# Altium PCB PCB1.pcbdoc
Units mil, origin at the board's own origin, x right, y up, seen from the top; angles counter-clockwise.
Board outline 2398 x 2138 mil, 2 copper layers (Top Layer, Bottom Layer), stack 62.206 mil thick; 49 components, 59 nets, 252 pads, 148 vias.
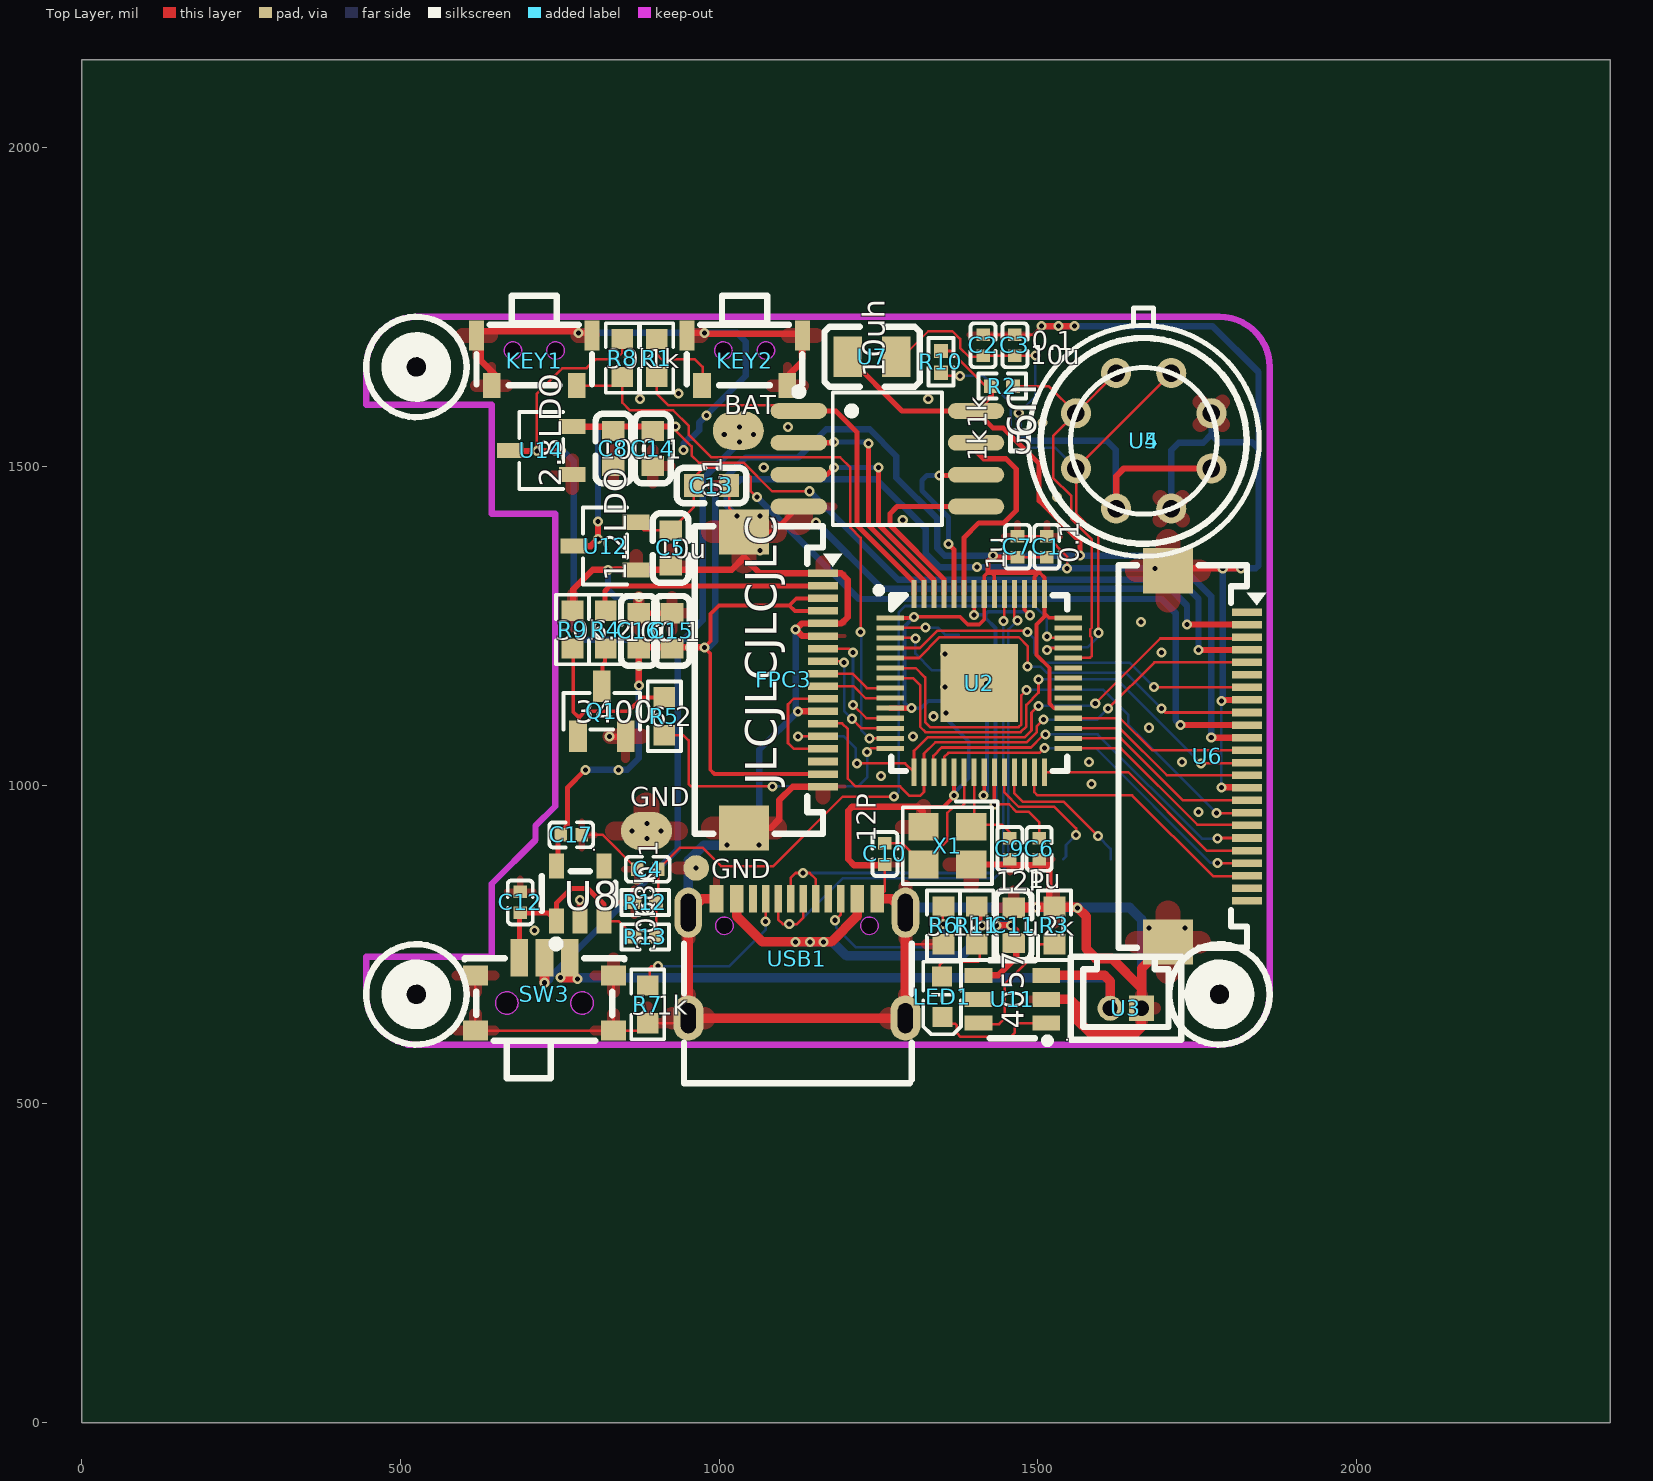
[diagram p0: Top Layer view]
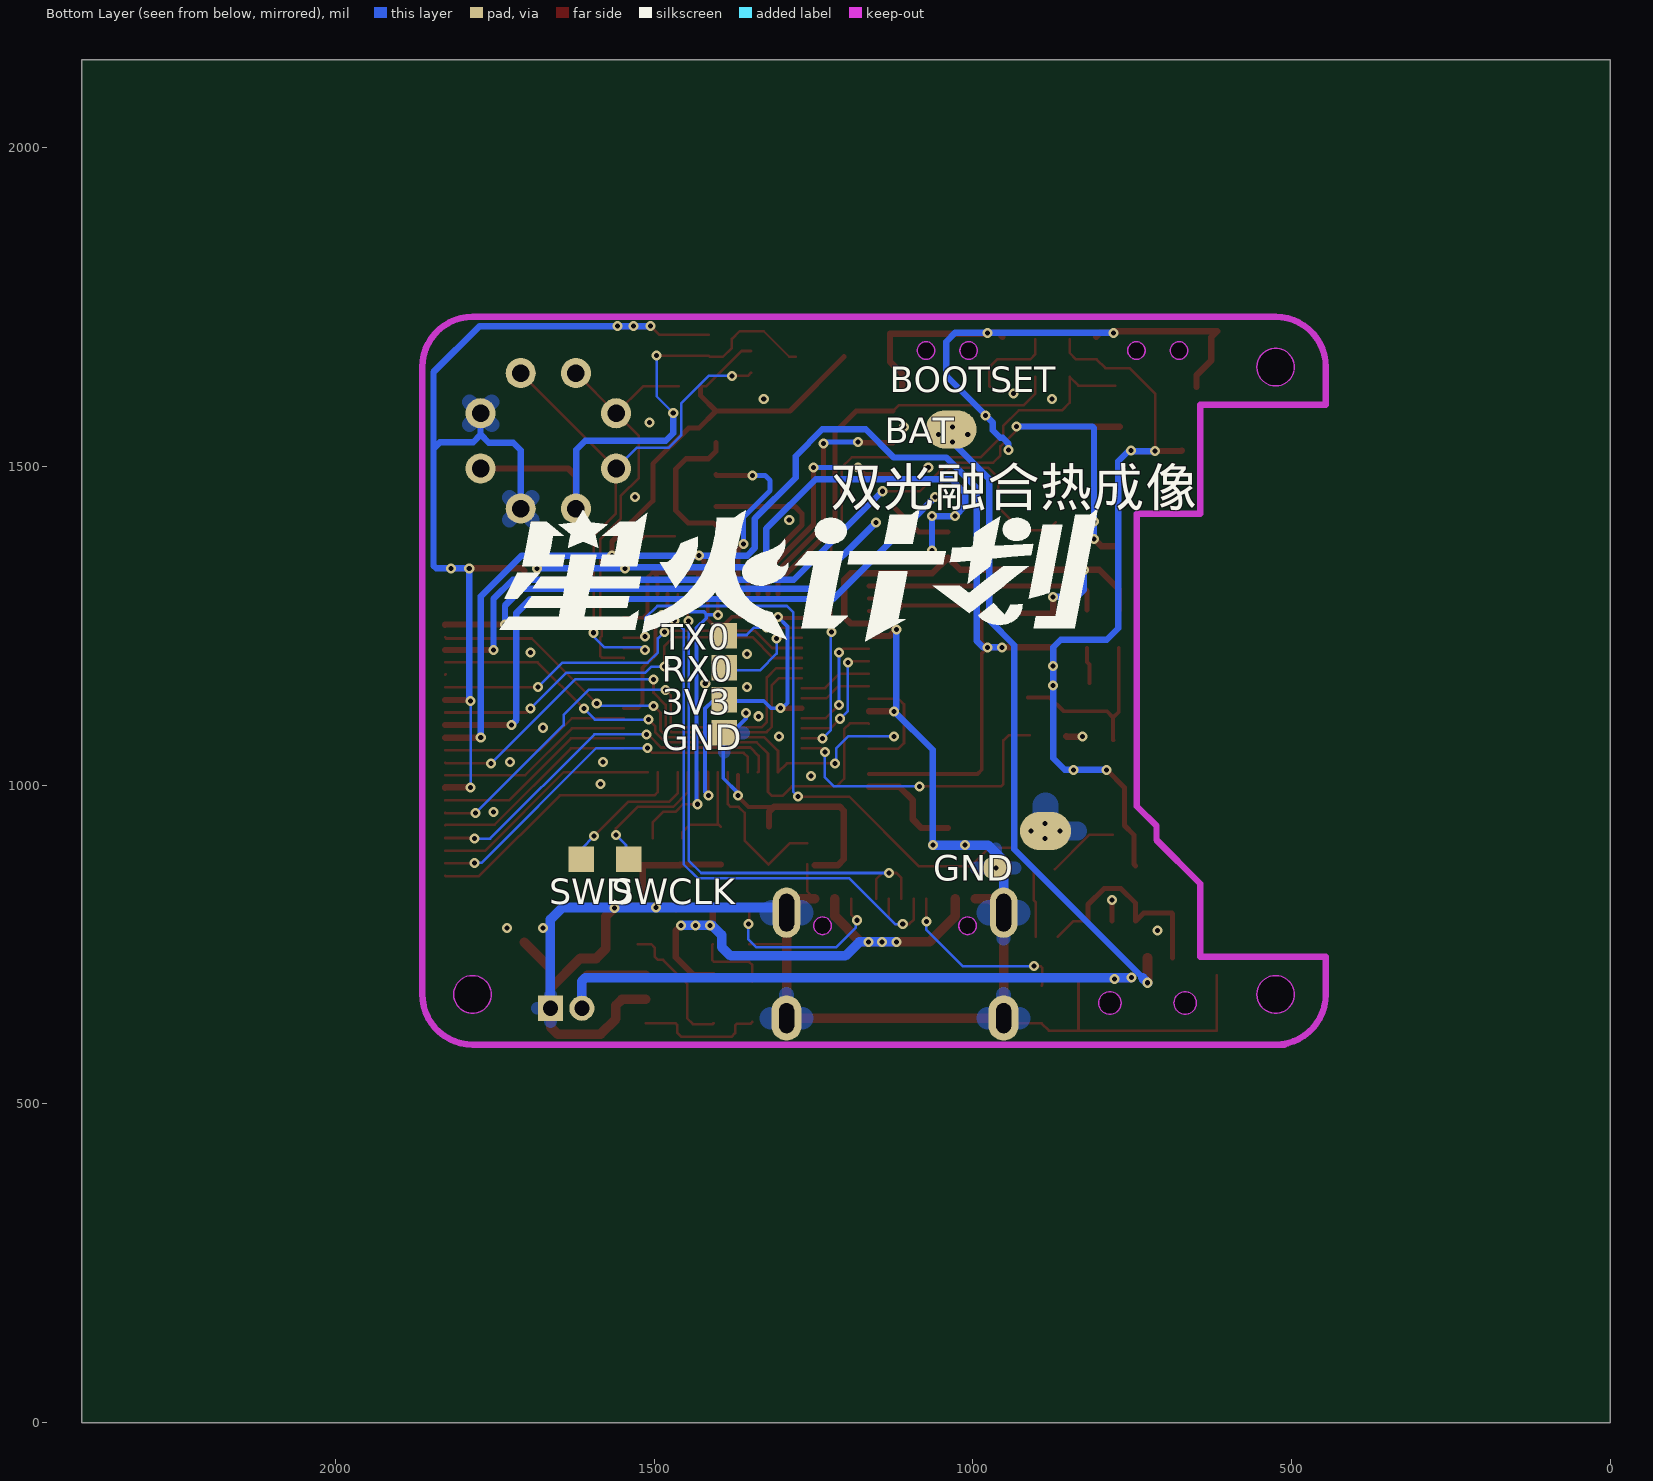
[diagram p1: Bottom Layer view, seen from below]

## Layer stack, top to bottom
Top Solder Mask Layer: solder mask 0.394, Dk 3.3
Top Layer: signal copper 1.379
Dielectric1: surface 59.449, FR4, Dk 4.5
Bottom Layer: signal copper 1.378
Bottom Solder Mask Layer: solder mask 0.394, Dk 3.3

## Board outline
2398,0 0,0 0,2138 2398,2138
cut-out: 1814.42,671.7 cw(c1784.89,671.7) 1755.36,671.7 cw(c1784.89,671.7)
cut-out: 554.58,671.7 cw(c525.05,671.7) 495.52,671.7 cw(c525.05,671.7)
cut-out: 554.58,1655.7 cw(c525.05,1655.7) 495.52,1655.7 cw(c525.05,1655.7)

## Design rules (kind name [scope] priority, off if disabled: settings)
BoardOutlineClearance Plane_Default_1 [All] p2 off: genericclearance=4 ignorepadtopadclearanceinfootprint=FALSE except(0: Arc-SplitContinuation Track-SplitContinuation SMDPad-SplitContinuation THPad-SplitContinuation Via-SplitContinuation Fill-SplitContinuation Region-SplitContinuation Poly-SplitContinuation Text-SplitContinuation Hole-SplitContinuation; 3: Arc-OutlineEdge Track-OutlineEdge SMDPad-OutlineEdge THPad-OutlineEdge Via-OutlineEdge Fill-OutlineEdge Region-OutlineEdge Poly-OutlineEdge Text-OutlineEdge Hole-OutlineEdge Arc-CutoutEdge Track-CutoutEdge SMDPad-CutoutEdge THPad-CutoutEdge Via-CutoutEdge Fill-CutoutEdge Region-CutoutEdge Poly-CutoutEdge Text-CutoutEdge Hole-CutoutEdge)
BoardOutlineClearance Copper_Default_1 [All] p4 off: genericclearance=4 ignorepadtopadclearanceinfootprint=FALSE except(0: Arc-SplitContinuation Track-SplitContinuation SMDPad-SplitContinuation THPad-SplitContinuation Via-SplitContinuation Fill-SplitContinuation Region-SplitContinuation Poly-SplitContinuation Text-SplitContinuation Hole-SplitContinuation; 3: Arc-OutlineEdge Track-OutlineEdge SMDPad-OutlineEdge THPad-OutlineEdge Via-OutlineEdge Fill-OutlineEdge Region-OutlineEdge Poly-OutlineEdge Text-OutlineEdge Hole-OutlineEdge Arc-CutoutEdge Track-CutoutEdge SMDPad-CutoutEdge THPad-CutoutEdge Via-CutoutEdge Fill-CutoutEdge Region-CutoutEdge Poly-CutoutEdge Text-CutoutEdge Hole-CutoutEdge)
BoardOutlineClearance Copper_gge126909_1 [All] p6 off: genericclearance=4 ignorepadtopadclearanceinfootprint=FALSE except(0: Arc-SplitContinuation Track-SplitContinuation SMDPad-SplitContinuation THPad-SplitContinuation Via-SplitContinuation Fill-SplitContinuation Region-SplitContinuation Poly-SplitContinuation Text-SplitContinuation Hole-SplitContinuation; 3: Arc-OutlineEdge Track-OutlineEdge SMDPad-OutlineEdge THPad-OutlineEdge Via-OutlineEdge Fill-OutlineEdge Region-OutlineEdge Text-OutlineEdge Hole-OutlineEdge Arc-CutoutEdge Track-CutoutEdge SMDPad-CutoutEdge THPad-CutoutEdge Via-CutoutEdge Fill-CutoutEdge Region-CutoutEdge Text-CutoutEdge Hole-CutoutEdge; 10: Poly-OutlineEdge Poly-CutoutEdge)
BoardOutlineClearance Copper_gge127110_1 [All] p8 off: genericclearance=4 ignorepadtopadclearanceinfootprint=FALSE except(0: Arc-SplitContinuation Track-SplitContinuation SMDPad-SplitContinuation THPad-SplitContinuation Via-SplitContinuation Fill-SplitContinuation Region-SplitContinuation Poly-SplitContinuation Text-SplitContinuation Hole-SplitContinuation; 3: Arc-OutlineEdge Track-OutlineEdge SMDPad-OutlineEdge THPad-OutlineEdge Via-OutlineEdge Fill-OutlineEdge Region-OutlineEdge Text-OutlineEdge Hole-OutlineEdge Arc-CutoutEdge Track-CutoutEdge SMDPad-CutoutEdge THPad-CutoutEdge Via-CutoutEdge Fill-CutoutEdge Region-CutoutEdge Text-CutoutEdge Hole-CutoutEdge; 10: Poly-OutlineEdge Poly-CutoutEdge)
BoardOutlineClearance Default_1 [All] p10: genericclearance=4 ignorepadtopadclearanceinfootprint=FALSE except(0: Arc-SplitContinuation Track-SplitContinuation SMDPad-SplitContinuation THPad-SplitContinuation Via-SplitContinuation Fill-SplitContinuation Region-SplitContinuation Poly-SplitContinuation Text-SplitContinuation Hole-SplitContinuation; 3: Arc-OutlineEdge Track-OutlineEdge SMDPad-OutlineEdge THPad-OutlineEdge Via-OutlineEdge Fill-OutlineEdge Region-OutlineEdge Poly-OutlineEdge Text-OutlineEdge Hole-OutlineEdge Arc-CutoutEdge Track-CutoutEdge SMDPad-CutoutEdge THPad-CutoutEdge Via-CutoutEdge Fill-CutoutEdge Region-CutoutEdge Poly-CutoutEdge Text-CutoutEdge Hole-CutoutEdge)
Clearance Plane_Default [All] p1 off: gap=4 ignorepadtopadclearanceinfootprint=FALSE except(3: SMDPad-Track SMDPad-SMDPad THPad-Track SMDPad-THPad THPad-THPad Track-Via SMDPad-Via THPad-Via Via-Via Fill-Track Region-Track Fill-SMDPad Region-SMDPad Fill-THPad Region-THPad Fill-Via Region-Via Fill-Fill Fill-Region Region-Region Poly-Track Poly-SMDPad Poly-THPad Poly-Via Poly-Fill Poly-Region Poly-Poly Arc-Track Arc-SMDPad Arc-THPad Arc-Via Fill-Arc Region-Arc Poly-Arc Arc-Arc Text-Track SMDPad-Text Text-THPad Text-Via Fill-Text Region-Text Poly-Text Arc-Text Text-Text Hole-Track Hole-SMDPad Hole-THPad Hole-Via Fill-Hole Region-Hole Poly-Hole Hole-Arc Hole-Text)
Clearance Copper_Default [All] p3 off: gap=4 ignorepadtopadclearanceinfootprint=FALSE except(3: SMDPad-Track SMDPad-SMDPad THPad-Track SMDPad-THPad THPad-THPad Track-Via SMDPad-Via THPad-Via Via-Via Fill-Track Region-Track Fill-SMDPad Region-SMDPad Fill-THPad Region-THPad Fill-Via Region-Via Fill-Fill Fill-Region Region-Region Poly-Track Poly-SMDPad Poly-THPad Poly-Via Poly-Fill Poly-Region Poly-Poly Arc-Track Arc-SMDPad Arc-THPad Arc-Via Fill-Arc Region-Arc Poly-Arc Arc-Arc Text-Track SMDPad-Text Text-THPad Text-Via Fill-Text Region-Text Poly-Text Arc-Text Text-Text Hole-Track Hole-SMDPad Hole-THPad Hole-Via Fill-Hole Region-Hole Poly-Hole Hole-Arc Hole-Text)
Clearance Copper_gge126909 [All] p5 off: gap=4 ignorepadtopadclearanceinfootprint=FALSE except(3: SMDPad-Track SMDPad-SMDPad THPad-Track SMDPad-THPad THPad-THPad Track-Via SMDPad-Via THPad-Via Via-Via Fill-Track Region-Track Fill-SMDPad Region-SMDPad Fill-THPad Region-THPad Fill-Via Region-Via Fill-Fill Fill-Region Region-Region Arc-Track Arc-SMDPad Arc-THPad Arc-Via Fill-Arc Region-Arc Arc-Arc Text-Track SMDPad-Text Text-THPad Text-Via Fill-Text Region-Text Arc-Text Text-Text Hole-Track Hole-SMDPad Hole-THPad Hole-Via Fill-Hole Region-Hole Hole-Arc Hole-Text; 10: Poly-Track Poly-SMDPad Poly-THPad Poly-Via Poly-Fill Poly-Region Poly-Poly Poly-Arc Poly-Text Poly-Hole)
Clearance Copper_gge127110 [All] p7 off: gap=4 ignorepadtopadclearanceinfootprint=FALSE except(3: SMDPad-Track SMDPad-SMDPad THPad-Track SMDPad-THPad THPad-THPad Track-Via SMDPad-Via THPad-Via Via-Via Fill-Track Region-Track Fill-SMDPad Region-SMDPad Fill-THPad Region-THPad Fill-Via Region-Via Fill-Fill Fill-Region Region-Region Arc-Track Arc-SMDPad Arc-THPad Arc-Via Fill-Arc Region-Arc Arc-Arc Text-Track SMDPad-Text Text-THPad Text-Via Fill-Text Region-Text Arc-Text Text-Text Hole-Track Hole-SMDPad Hole-THPad Hole-Via Fill-Hole Region-Hole Hole-Arc Hole-Text; 10: Poly-Track Poly-SMDPad Poly-THPad Poly-Via Poly-Fill Poly-Region Poly-Poly Poly-Arc Poly-Text Poly-Hole)
Clearance Default [All] p9: gap=4 ignorepadtopadclearanceinfootprint=FALSE except(3: SMDPad-Track SMDPad-SMDPad THPad-Track SMDPad-THPad THPad-THPad Track-Via SMDPad-Via THPad-Via Via-Via Fill-Track Region-Track Fill-SMDPad Region-SMDPad Fill-THPad Region-THPad Fill-Via Region-Via Fill-Fill Fill-Region Region-Region Poly-Track Poly-SMDPad Poly-THPad Poly-Via Poly-Fill Poly-Region Poly-Poly Arc-Track Arc-SMDPad Arc-THPad Arc-Via Fill-Arc Region-Arc Poly-Arc Arc-Arc Text-Track SMDPad-Text Text-THPad Text-Via Fill-Text Region-Text Poly-Text Arc-Text Text-Text Hole-Track Hole-SMDPad Hole-THPad Hole-Via Fill-Hole Region-Hole Poly-Hole Hole-Arc Hole-Text)
DiffPairsRouting differentialPair [All] p1: maxlimit=6 minlimit=6 mostfreqgap=6 toplayer_minwidth=5 toplayer_prefwidth=10 toplayer_maxwidth=100 toplayer_mingap=6 toplayer_prefgap=6 toplayer_maxgap=6 bottomlayer_minwidth=5 bottomlayer_prefwidth=10 bottomlayer_maxwidth=100 bottomlayer_mingap=6 bottomlayer_prefgap=6 bottomlayer_maxgap=6 maxuncoupledlength=10
HoleToHoleClearance otherClearance [All] p1: gap=11.8 allowstackedmicrovias=TRUE
Length netLength [All] p1: minlimit=0 maxlimit=0
PasteMaskExpansion Common [All] p1: expansion=0
PlaneConnect Default_4 [All] p1: planeconnectstyle=Relief reliefexpansion=20 reliefentries=4 reliefconductorwidth=0 reliefairgap=10
PolygonConnect gge126909 [All] p1 off: connectstyle=Relief reliefconductorwidth=0 reliefentries=4 polygonreliefangle="90 Angle" airgapwidth=1 smdpad.connectstyle=Relief smdpad.reliefconductorwidth=0 smdpad.reliefentries=4 smdpad.polygonreliefangle="90 Angle" smdpad.airgapwidth=10 via.connectstyle=Relief via.reliefconductorwidth=10 via.reliefentries=4 via.polygonreliefangle="90 Angle" via.airgapwidth=10
PolygonConnect gge127110 [All] p2 off: connectstyle=Relief reliefconductorwidth=0 reliefentries=4 polygonreliefangle="90 Angle" airgapwidth=1 smdpad.connectstyle=Relief smdpad.reliefconductorwidth=0 smdpad.reliefentries=4 smdpad.polygonreliefangle="90 Angle" smdpad.airgapwidth=10 via.connectstyle=Relief via.reliefconductorwidth=10 via.reliefentries=4 via.polygonreliefangle="90 Angle" via.airgapwidth=10
PolygonConnect Default_5 [All] p3: connectstyle=Relief reliefconductorwidth=0 reliefentries=4 polygonreliefangle="90 Angle" airgapwidth=1 smdpad.connectstyle=Relief smdpad.reliefconductorwidth=0 smdpad.reliefentries=4 smdpad.polygonreliefangle="90 Angle" smdpad.airgapwidth=10 via.connectstyle=Relief via.reliefconductorwidth=10 via.reliefentries=4 via.polygonreliefangle="90 Angle" via.airgapwidth=10
RoutingVias Default_3 [All] p1: holewidth=7.87 width=15.75 viastyle="Through Hole" minholewidth=7.87 minwidth=15.75 maxholewidth=2362 maxwidth=3938
SolderMaskExpansion Common_1 [IsVia] p1: expansion=-1000 istentingtop=TRUE
SolderMaskExpansion Common_1 [All] p2: expansion=2 istentingtop=FALSE
Width Default_2 [All] p1: maxlimit=1000 minlimit=4 preferedwidth=4

## Components (designator, comment, footprint, x,y, rotation, side; value= is the part's Value field where it differs from the comment)
C1 "100nF" C0402 1514,1374 r90 top
C2 "10uF" C0402 1414,1690 r270 top
C3 "100nF" C0402 1464,1690 r270 top
C4 "100nF" C0402 888,868 r0 top
C5 "10uF" C0603 924,1372 r270 top
C6 "1uF" C0402 1502,900 r270 top
C7 "1uF" C0402 1468,1374 r90 top
C8 "10uF" C0603 834,1528 r270 top
C9 "12pF" C0402 1456,900 r90 top
C10 "12pF" C0402 1260,892 r270 top
C11 "1uF" C0603 1462,780 r90 top
C12 "1uF" C0402 688,816 r90 top
C13 "100nF" C0603 988,1470 r0 top
C14 "100nF" C0603 896,1528 r270 top
C15 "100nF" C0603 926,1242 r270 top
C16 "10uF" C0603 874,1242 r90 top
C17 "1uF" C0402 768,922 r0 top
FPC3 "FPC 0.5-18P HYH2.0" FPC-SMD_18P-P0.50_FPC-0.5-18P-HYH2.0 1101,1165 r270 top
KEY1 "1TS003B-2500-3500A-CT" KEY-SMD_1TS003B-2500-3500A-CT 710,1666 r180 top
KEY2 "1TS003B-2500-3500A-CT" KEY-SMD_1TS003B-2500-3500A-CT 1040,1666 r180 top
LED1 "NCD0603G1" LED0603-RD_1 1350,668 r90 top
Q1 "AO3400A" SOT-23-3_L2.9-W1.3-P1.90-LS2.4-BR 816,1116 r270 top
R1 "1kΩ" R0603 902,1670 r90 top
R2 "1kΩ" R0402 1444,1626 r180 top
R3 "2kΩ" R0603 1526,780 r270 top
R4 "6.2Ω" R0603 822,1244 r270 top
R5 "6.2Ω" R0603 914,1108 r270 top
R6 "5.1kΩ" R0603 1352,780 r90 top
R7 "5.1kΩ" R0603 888,656 r270 top
R8 "30kΩ" R0603 848,1670 r270 top
R9 "30kΩ" R0603 770,1244 r90 top
R10 "1kΩ" R0402 1348,1664 r90 top
R11 "1kΩ" R0603 1404,780 r270 top
R12 "68kΩ" R0402 884,816 r0 top
R13 "30kΩ" R0402 884,762 r0 top
SW3 "MINI MSK12CO2" SW-SMD_MSK12CO2 726,672 r0 top
U2 "RP2040" LQFN-56_L7.0-W7.0-P0.4-EP 1408,1160 r0 top
U3 "ZX-MX1.25-2PZZ" CONN-TH_2P-P1.25_MEGASTAR_ZX-MX1.25-2PZZ 1638,650 r180 top
U4 "HEIMANN" TO-39-4_MELEXIS_MLX90640 1666,1540 r90 top
U5 "MLX90640ESF-BAB-000-TU" TO-39-4_MELEXIS_MLX90640 1666,1540 r0 top
U6 "FPC 0.5-24P HYH2.0" FPC-SMD_24P-P0.50_FPC-0.5-24P-HYH2.0 1766,1045 r270 top
U7 "10uH" IND-SMD_L2.0-W1.6-1 1240,1672 r180 top
U8 "RT9013-33GB-MS" SOT-23-5_L2.9-W1.6-P0.95-LS2.8-BR 782,830 r270 top
U9 "W25Q32JVSSIQ" SOIC-8_L5.3-W5.3-P1.27-LS8.0-BL 1264,1512 r270 top
U11 "TP4057" SOT-23-6_L2.9-W1.6-P0.95-LS2.8-BR 1460,664 r0 top
U12 "XC6206P122MR(1uA)" SOT-23-3_L2.9-W1.6-P1.90-LS2.8-BR 821,1375 r0 top
U14 "XC6206P282MR(1uA)" SOT-23-3_L2.9-W1.6-P1.90-LS2.8-BR 721,1525 r0 top
USB1 "TYPE-C 16PIN 2MD(073)" USB-C-SMD_TYPE-C-6PIN-2MD-073 1122,728 r0 top
X1 "12MHz" OSC-SMD_4P-L2.5-W2.0-BL 1358,905 r180 top

## Footprints (in the part's own frame and the unit in brackets; to place one, negate y for a bottom-side part, rotate by r counter-clockwise, add the part's x,y. Pads: shape width x height; smd on the part's side, far side on the other; paste and mask are expansions set on the pad)
C0402 [mm]
  rect 0.5x0.54 smd: 1(-0.42,0) 2(0.42,0)
  silkscreen extent -0.87,-0.5 0.87,0.5
C0603 [mm]
  rect 0.8x0.9 smd: 1(-0.7,0) 2(0.7,0)
  silkscreen extent -1.39,-0.71 1.39,0.71
CONN-TH_2P-P1.25_MEGASTAR_ZX-MX1.25-2PZZ [mm]
  rect 1x1 hole 0.6: 1(-0.625,0)
  round 1 hole 0.6: 2(0.625,0)
  silkscreen extent -2.2,-2.05 2.2,1.25
FPC-SMD_18P-P0.50_FPC-0.5-18P-HYH2.0 [mm]
  rect 0.3x1.2 smd paste+0 mask+0.05: 1(-4.25,1.575) 2(-3.75,1.575) 3(-3.25,1.575) 4(-2.75,1.575) 5(-2.25,1.575) 6(-1.75,1.575) 7(-1.25,1.575) 8(-0.75,1.575) 9(-0.25,1.575) 10(0.25,1.575) 11(0.75,1.575) 12(1.25,1.575) 13(1.75,1.575) 14(2.25,1.575) 15(2.75,1.575) 16(3.25,1.575) 17(3.75,1.575) 18(4.25,1.575)
  rect 1.8x2 smd paste+0 mask+0.05: 19(5.9,-1.575) 20(-5.9,-1.575)
  silkscreen extent -6.13,-3.54 6.12,2.34
FPC-SMD_24P-P0.50_FPC-0.5-24P-HYH2.0 [mm]
  rect 0.3x1.2 smd paste+0 mask+0.05: 1(-5.75,1.575) 2(-5.25,1.575) 3(-4.75,1.575) 4(-4.25,1.575) 5(-3.75,1.575) 6(-3.25,1.575) 7(-2.75,1.575) 8(-2.25,1.575) 9(-1.75,1.575) 10(-1.25,1.575) 11(-0.75,1.575) 12(-0.25,1.575) 13(0.25,1.575) 14(0.75,1.575) 15(1.25,1.575) 16(1.75,1.575) 17(2.25,1.575) 18(2.75,1.575) 19(3.25,1.575) 20(3.75,1.575) 21(4.25,1.575) 22(4.75,1.575) 23(5.25,1.575) 24(5.75,1.575)
  rect 1.8x2 smd paste+0 mask+0.05: 25(7.4,-1.575) 26(-7.4,-1.575)
  silkscreen extent -7.63,-3.54 7.62,2.34
IND-SMD_L2.0-W1.6-1 [mm]
  rect 1.133x1.6 smd: 1(-0.966,0) 2(0.966,0)
  silkscreen extent -1.9,-1.2 1.9,1.2
KEY-SMD_1TS003B-2500-3500A-CT [mm]
  rect 0.6x1.2 smd: 0(-2.3,-1) 0(2.3,-1)
  rect 0.7x1 smd: 1(-1.7,1) 2(1.7,1)
  Board Outline Layer circle w0.003: c-0.85,-0.4 r0.35
  Board Outline Layer circle w0.003: c0.85,-0.4 r0.35
  Board Outline Layer region: -1.2,-0.4 -1.165,-0.248 -1.068,-0.126 -0.928,-0.059 -0.772,-0.059 -0.632,-0.126 -0.535,-0.248 -0.5,-0.4 -0.5,-0.4 -0.535,-0.552 -0.632,-0.674 -0.772,-0.741 -0.928,-0.741 -1.068,-0.674 -1.165,-0.552 -1.2,-0.4
  Board Outline Layer region: -1.2,-0.4 -1.191,-0.322 -1.165,-0.248 -1.124,-0.182 -1.068,-0.126 -1.002,-0.085 -0.928,-0.059 -0.85,-0.05 -0.772,-0.059 -0.698,-0.085 -0.632,-0.126 -0.576,-0.182 -0.535,-0.248 -0.509,-0.322 -0.5,-0.4 -0.509,-0.478 -0.535,-0.552 -0.576,-0.618 -0.632,-0.674 -0.698,-0.715 -0.772,-0.741 -0.85,-0.75 -0.928,-0.741 -1.002,-0.715 -1.068,-0.674 -1.124,-0.618 -1.165,-0.552 -1.191,-0.478
  Board Outline Layer region: 0.5,-0.4 0.535,-0.248 0.632,-0.126 0.772,-0.059 0.928,-0.059 1.068,-0.126 1.165,-0.248 1.2,-0.4 1.2,-0.4 1.165,-0.552 1.068,-0.674 0.928,-0.741 0.772,-0.741 0.632,-0.674 0.535,-0.552 0.5,-0.4
  Board Outline Layer region: 0.5,-0.4 0.509,-0.322 0.535,-0.248 0.576,-0.182 0.632,-0.126 0.698,-0.085 0.772,-0.059 0.85,-0.05 0.928,-0.059 1.002,-0.085 1.068,-0.126 1.124,-0.182 1.165,-0.248 1.191,-0.322 1.2,-0.4 1.191,-0.478 1.165,-0.552 1.124,-0.618 1.068,-0.674 1.002,-0.715 0.928,-0.741 0.85,-0.75 0.772,-0.741 0.698,-0.715 0.632,-0.674 0.576,-0.618 0.535,-0.552 0.509,-0.478
  Multi-Layer board cut-out: -1.2,-0.4 -1.165,-0.248 -1.068,-0.126 -0.928,-0.059 -0.772,-0.059 -0.632,-0.126 -0.535,-0.248 -0.5,-0.4 -0.5,-0.4 -0.535,-0.552 -0.632,-0.674 -0.772,-0.741 -0.928,-0.741 -1.068,-0.674 -1.165,-0.552 -1.2,-0.4
  Multi-Layer board cut-out: 0.5,-0.4 0.535,-0.248 0.632,-0.126 0.772,-0.059 0.928,-0.059 1.068,-0.126 1.165,-0.248 1.2,-0.4 1.2,-0.4 1.165,-0.552 1.068,-0.674 0.928,-0.741 0.772,-0.741 0.632,-0.674 0.535,-0.552 0.5,-0.4
  silkscreen extent -2.3,-2.59 2.3,0.99
LED0603-RD_1 [mm]
  rect 0.8x0.8 smd: 1(-0.799,-0.004) 2(0.799,0.004)
  silkscreen extent -1.49,-0.75 1.39,0.76
LQFN-56_L7.0-W7.0-P0.4-EP [mm]
  rect 1.1x0.2 smd paste-100 mask+0.05: 1(-3.55,2.6) 2(-3.55,2.2) 3(-3.55,1.8) 4(-3.55,1.4) 5(-3.55,1) 6(-3.55,0.6) 7(-3.55,0.2) 8(-3.55,-0.2) 9(-3.55,-0.6) 10(-3.55,-1) 11(-3.55,-1.4) 12(-3.55,-1.8) 13(-3.55,-2.2) 14(-3.55,-2.6) 29(3.55,-2.6) 30(3.55,-2.2) 31(3.55,-1.8) 32(3.55,-1.4) 33(3.55,-1) 34(3.55,-0.6) 35(3.55,-0.2) 36(3.55,0.2) 37(3.55,0.6) 38(3.55,1) 39(3.55,1.4) 40(3.55,1.8) 41(3.55,2.2) 42(3.55,2.6)
  rect 0.2x1.1 smd paste-100 mask+0.05: 15(-2.6,-3.55) 16(-2.2,-3.55) 17(-1.8,-3.55) 18(-1.4,-3.55) 19(-1,-3.55) 20(-0.6,-3.55) 21(-0.2,-3.55) 22(0.2,-3.55) 23(0.6,-3.55) 24(1,-3.55) 25(1.4,-3.55) 26(1.8,-3.55) 27(2.2,-3.55) 28(2.6,-3.55) 43(2.6,3.55) 44(2.2,3.55) 45(1.8,3.55) 46(1.4,3.55) 47(1,3.55) 48(0.6,3.55) 49(0.2,3.55) 50(-0.2,3.55) 51(-0.6,3.55) 52(-1,3.55) 53(-1.4,3.55) 54(-1.8,3.55) 55(-2.2,3.55) 56(-2.6,3.55)
  rect 3.1x3.1 smd paste-100 mask+0.05: 57(0,0)
  silkscreen extent -4.13,-3.5 3.5,3.83
OSC-SMD_4P-L2.5-W2.0-BL [mm]
  rect 1.2x1.1 smd: 1(-0.95,-0.75) 2(0.95,-0.75) 3(0.95,0.75) 4(-0.95,0.75)
  silkscreen extent -2.01,-1.76 1.78,1.53
R0402 [mm]
  rect 0.566x0.54 smd paste-100 mask+0.051: 1(-0.433,0) 2(0.433,0)
  silkscreen extent -0.94,-0.5 0.94,0.5
R0603 [mil]
  rect 31.75x34.02 smd paste-3937.01 mask+2: 1(-29.66,0) 2(29.66,0)
  silkscreen extent -55,-26 55,26
SOIC-8_L5.3-W5.3-P1.27-LS8.0-BL [mm]
  oval 0.63x2.25 smd: 1(-1.905,-3.53) 2(-0.635,-3.53) 3(0.635,-3.53) 4(1.905,-3.53) 5(1.905,3.53) 6(0.635,3.53) 7(-0.635,3.53) 8(-1.905,3.53)
  silkscreen extent -2.82,-3.68 2.64,2.18
SOT-23-3_L2.9-W1.3-P1.90-LS2.4-BR [mm]
  rect 1.25x0.7 smd: 1(1,-0.95) 2(1,0.95) 3(-1,0)
  silkscreen extent -0.73,-1.53 0.73,1.53
SOT-23-3_L2.9-W1.6-P1.90-LS2.8-BR [mm]
  rect 1.07x0.6 smd: 1(1.235,-0.95) 2(1.235,0.95) 3(-1.235,0)
  silkscreen extent -0.88,-1.54 0.88,1.54
SOT-23-5_L2.9-W1.6-P0.95-LS2.8-BR [mm]
  rect 1x0.6 smd paste+0 mask+0.05: 1(1.1,-0.95) 2(1.1,0) 3(1.1,0.95) 4(-1.1,0.95) 5(-1.1,-0.95)
  silkscreen extent -0.89,-1.52 2.16,1.4
SOT-23-6_L2.9-W1.6-P0.95-LS2.8-BR [mm]
  rect 1.1x0.6 smd paste+0 mask+0.051: 1(1.35,-0.95) 2(1.35,0) 3(1.35,0.95) 4(-1.35,0.95) 5(-1.35,0) 6(-1.35,-0.95)
  silkscreen extent -0.9,-1.78 1.52,1.55
SW-SMD_MSK12CO2 [mm]
  rect 0.7x1.5 smd: 1(-1,1.45) 2(0,1.45) 3(1,1.45)
  rect 1x0.8 smd: 4(-2.75,-1.45) 4(-2.75,0.75) 5(2.75,-1.45) 5(2.75,0.75)
  Board Outline Layer circle w0.003: c-1.5,-0.35 r0.45
  Board Outline Layer circle w0.003: c1.5,-0.35 r0.45
  Board Outline Layer region: -1.05,-0.35 -1.094,-0.545 -1.219,-0.702 -1.4,-0.789 -1.6,-0.789 -1.78,-0.702 -1.905,-0.545 -1.95,-0.35 -1.95,-0.35 -1.905,-0.155 -1.78,0.002 -1.6,0.089 -1.4,0.089 -1.219,0.002 -1.094,-0.155 -1.05,-0.35
  Board Outline Layer region: -1.05,-0.35 -1.06,-0.444 -1.089,-0.533 -1.136,-0.615 -1.199,-0.684 -1.275,-0.74 -1.361,-0.778 -1.453,-0.798 -1.547,-0.798 -1.639,-0.778 -1.725,-0.74 -1.801,-0.684 -1.864,-0.615 -1.911,-0.533 -1.94,-0.444 -1.95,-0.35 -1.94,-0.256 -1.911,-0.167 -1.864,-0.086 -1.801,-0.016 -1.725,0.04 -1.639,0.078 -1.547,0.098 -1.453,0.098 -1.361,0.078 -1.275,0.04 -1.199,-0.016 -1.136,-0.086 -1.089,-0.167 -1.06,-0.256
  Board Outline Layer region: 1.95,-0.35 1.906,-0.545 1.781,-0.702 1.6,-0.789 1.4,-0.789 1.22,-0.702 1.095,-0.545 1.05,-0.35 1.05,-0.35 1.095,-0.155 1.22,0.002 1.4,0.089 1.6,0.089 1.781,0.002 1.906,-0.155 1.95,-0.35
  Board Outline Layer region: 1.95,-0.35 1.94,-0.444 1.911,-0.533 1.864,-0.615 1.801,-0.684 1.725,-0.74 1.639,-0.778 1.547,-0.798 1.453,-0.798 1.361,-0.778 1.275,-0.74 1.199,-0.684 1.136,-0.615 1.089,-0.533 1.06,-0.444 1.05,-0.35 1.06,-0.256 1.089,-0.167 1.136,-0.086 1.199,-0.016 1.275,0.04 1.361,0.078 1.453,0.098 1.547,0.098 1.639,0.078 1.725,0.04 1.801,-0.016 1.864,-0.086 1.911,-0.167 1.94,-0.256
  Multi-Layer board cut-out: -1.05,-0.35 -1.094,-0.545 -1.219,-0.702 -1.4,-0.789 -1.6,-0.789 -1.78,-0.702 -1.905,-0.545 -1.95,-0.35 -1.95,-0.35 -1.905,-0.155 -1.78,0.002 -1.6,0.089 -1.4,0.089 -1.219,0.002 -1.094,-0.155 -1.05,-0.35
  Multi-Layer board cut-out: 1.95,-0.35 1.906,-0.545 1.781,-0.702 1.6,-0.789 1.4,-0.789 1.22,-0.702 1.095,-0.545 1.05,-0.35 1.05,-0.35 1.095,-0.155 1.22,0.002 1.4,0.089 1.6,0.089 1.781,0.002 1.906,-0.155 1.95,-0.35
  silkscreen extent -3.17,-3.35 3.17,1.43
TO-39-4_MELEXIS_MLX90640 [mm]
  round 1.2 hole 0.7 copper offset -0.001,0 paste+0 mask+0.05: 1(-1.099,2.7) 2(-1.099,-2.7) 3(1.101,-2.7) 4(1.101,2.7)
  silkscreen extent -4.6,-4.6 4.6,5.3
USB-C-SMD_TYPE-C-6PIN-2MD-073 [mm]
  rect 0.55x1.1 smd paste-100 mask+0.05: 1(-3.2,2.375) 2(-2.4,2.375) 11(2.4,2.375) 12(3.2,2.375)
  rect 0.3x1.1 smd paste-100 mask+0.05: 3(-1.75,2.375) 4(-1.25,2.375) 5(-0.75,2.375) 6(-0.25,2.375) 7(0.25,2.375) 8(0.75,2.375) 9(1.25,2.375) 10(1.75,2.375)
  oval 1.2x1.8 hole 0.6 slot 1.2 at 90 deg paste+0 mask+0.05: 13(-4.325,-2.375) 14(4.325,-2.375)
  oval 1.1x2 hole 0.6 slot 1.5 at 90 deg paste+0 mask+0.05: 13(-4.325,1.825) 14(4.325,1.825)
  Board Outline Layer circle w0.003: c-2.89,1.305 r0.35
  Board Outline Layer circle w0.003: c2.89,1.305 r0.35
  Board Outline Layer region: -2.54,1.305 -2.575,1.153 -2.672,1.031 -2.812,0.964 -2.968,0.964 -3.108,1.031 -3.205,1.153 -3.24,1.305 -3.24,1.305 -3.205,1.457 -3.108,1.579 -2.968,1.646 -2.812,1.646 -2.672,1.579 -2.575,1.457 -2.54,1.305
  Board Outline Layer region: -2.54,1.305 -2.549,1.227 -2.575,1.153 -2.616,1.087 -2.672,1.031 -2.738,0.99 -2.812,0.964 -2.89,0.955 -2.968,0.964 -3.042,0.99 -3.108,1.031 -3.164,1.087 -3.205,1.153 -3.231,1.227 -3.24,1.305 -3.231,1.383 -3.205,1.457 -3.164,1.523 -3.108,1.579 -3.042,1.62 -2.968,1.646 -2.89,1.655 -2.812,1.646 -2.738,1.62 -2.672,1.579 -2.616,1.523 -2.575,1.457 -2.549,1.383
  Board Outline Layer region: 3.24,1.305 3.205,1.153 3.108,1.031 2.968,0.964 2.812,0.964 2.672,1.031 2.575,1.153 2.54,1.305 2.54,1.305 2.575,1.457 2.672,1.579 2.812,1.646 2.968,1.646 3.108,1.579 3.205,1.457 3.24,1.305
  Board Outline Layer region: 3.24,1.305 3.231,1.227 3.205,1.153 3.164,1.087 3.108,1.031 3.042,0.99 2.968,0.964 2.89,0.955 2.812,0.964 2.738,0.99 2.672,1.031 2.616,1.087 2.575,1.153 2.549,1.227 2.54,1.305 2.549,1.383 2.575,1.457 2.616,1.523 2.672,1.579 2.738,1.62 2.812,1.646 2.89,1.655 2.968,1.646 3.042,1.62 3.108,1.579 3.164,1.523 3.205,1.457 3.231,1.383
  Multi-Layer board cut-out: -2.54,1.305 -2.575,1.153 -2.672,1.031 -2.812,0.964 -2.968,0.964 -3.108,1.031 -3.205,1.153 -3.24,1.305 -3.24,1.305 -3.205,1.457 -3.108,1.579 -2.968,1.646 -2.812,1.646 -2.672,1.579 -2.575,1.457 -2.54,1.305
  Multi-Layer board cut-out: 3.24,1.305 3.205,1.153 3.108,1.031 2.968,0.964 2.812,0.964 2.672,1.031 2.575,1.153 2.54,1.305 2.54,1.305 2.575,1.457 2.672,1.579 2.812,1.646 2.968,1.646 3.108,1.579 3.205,1.457 3.24,1.305
  silkscreen extent -4.5,-4.97 4.57,0.6

## Free pads (board coordinates)
  oval 80x60 smd: 1(886,928) 1(1030,1556)
  oval 80x60 smd far side: 1(886,928) 1(1034,1558)
  round 40 smd: 1(964,870)
  round 40 smd far side: 1(964,870)
  rect 40x40 smd far side: 1(1390,1184) 2(1390,1082) 2(1390,1134) 2(1390,1234) 2(1540,884) 2(1614,884)

## Via types
v1: diameter 15.75, hole 7.9, Top Layer to Bottom Layer, 148 vias

## Nets (pads, with @x,y where several pads share a name; then routed paths per layer and width w, separated by ;. In a path a pad name is that pad's centre, name@x,y a point inside that pad or via, vN(x,y) a via of type N, cw(c..) or ccw(c..) an arc to the next point about the centre after c; other vN are vias at no path point)
1.1V: C6.1 U2.23 U2.45 U2.50 | length 624.2
  Top Layer w4: v1(1432,970) 1454.69,970 1466.69,958 1486,958 1502,942 C6.1
  Top Layer w6: v1(1400,1267.13) 1400.12,1267.25 U2.50 ; U2.23 1431.62,970.38 v1(1432,970) ; U2.45 1478.86,1275.14 v1(1487.51,1266.49)
  Bottom Layer w6: v1(1400,1267.13) 1416.87,1267.13 1418.13,1265.87 ; v1(1432,970) 1433.66,971.66 1433.66,1246.34 1418.13,1261.87 1418.13,1265.87 ; v1(1487.51,1266.49) 1482,1272 1422,1272 1418.13,1268.13 1418.13,1265.87
3V3: C1.1 C7.1 C15.2 C16.1 C17.1 FPC3.3 FPC3.4 FPC3.17 pad.2@1390,1134 R2.2 R8.1 R10.2 U2.1 U2.10 U2.22 U2.33 U2.42 U2.43 U2.44 U2.48 U2.49 U6.11 U7.2 U8.5 U9.8 U14.3 | length 5579.1
  Top Layer w4: v1@714,1525 714,1614 754,1654 792,1654 806,1668 838,1668 848,1678 R8.1 ; R10.2 1362.96,1681.04 1418,1626 R2.2 ; C7.1 C1.1
  Top Layer w6: FPC3.17 992.64,1017.36 986,1024 986,1206.73 v1(976.73,1216) 986.44,1225.71 986.44,1268.44 1000,1282 1110,1282 ; FPC3.4 1118.74,1273.26 1110,1282 ; FPC3.3 1120.95,1292.95 1110,1282 ; U2.1 1304.36,1262.36 v1(1306,1264) 1378,1264 1390,1252 1408,1252 1415.87,1259.87 U2.49 1415.87,1327.87 1422,1334 ; v1(1414.99,984) 1415.87,984.88 U2.22 ; 1426,1334 1431.62,1328.38 U2.48 ; U2.44 1494.61,1326.61 1500.24,1332.24 1503.76,1332.24 ; 1502,1334 1503.76,1332.24 ; U2.33 1525.37,1120.63 1518,1128 1518,1184 1498,1204 1498,1252 1510.36,1264.36 1510.36,1269.64 ; U2.42 1547.6,1262.53 1517.47,1262.53 1510.36,1269.64 ; 1503.76,1332.24 1510.36,1325.64 U2.43 1510.36,1269.64
  Top Layer w8: U8.5 747.46,876.18 747.46,922 762,936.54 762,996 790,1024 v1(790.45,1024) ; U7.2 1286.95,1587 U9.8 ; U2.10 v1(1302.1,1120.63) ; R2.2 1426.96,1610.98 U9.8 ; C7.1 1427.46,1357.46 1422,1352 1422,1334 1426,1334 1502,1334 ; v1(1566,1360) 1566,1382 1502,1446 1502,1504 1446,1560 1429.98,1560 U9.8
  Top Layer w10: U14.3 673.24,1524.13 713.13,1524.13 v1@714,1525 ; v1(714,1524) 751,1524 v1(752,1525) ; v1(874,1156) v1(874,1186.71) 874,1216.44 930,1216.44 930.44,1216 v1(954,1216) v1(976.73,1216) ; v1(1772,1074.46) U6.11@1827.94,1074.46
  Bottom Layer w6: v1(1306,1264) 1291,1249 1291,1129 1299.37,1120.63 v1(1302.1,1120.63) 1316.63,1120.63 1328,1132 1408,1132 1420,1120 1420,989.01 v1(1414.99,984)
  Bottom Layer w10: v1(714,1524) 756,1524 772,1508 772,1246 790,1228 862,1228 874,1216 v1(874,1186.71) v1(874,1156) 874,1042 856,1024 v1(842,1024) v1(790.45,1024) ; v1(954,1216) v1(976.73,1216) 984,1216 994,1226 994,1466 1042,1514 1124,1514 1168,1558 1236,1558 1278.02,1515.98 1278.02,1482.13 1342,1418.14 1342,1372 1354.13,1359.87 v1(1429.93,1359.87) 1708.13,1359.87 1772,1296 v1(1772,1074.46)
$1N4171: KEY2.2 R1.2 | length 135.7
  Top Layer w4: R1.2 902,1676 910,1668 962,1668 974,1656 974,1625.56 KEY2.2@973.07,1624.63
$1N4175: C2.2 C3.2 U4.2 U5.2 U7.1 | length 853.6
  Top Layer w4: U7.1 1288,1672 1328,1712 1366,1712 1378,1700 1378,1686 1392,1672 1412.54,1672 C2.2 C3.2 v1@1496,1673.46
  Top Layer w10: U5.2 1622.69,1484.69 1634.69,1496.69 U4.2
  Bottom Layer w4: v1(1470,1584) 1496,1610 v1(1496,1674)
  Bottom Layer w10: v1(1470,1584) 1470,1552 1482,1540 1608,1540 1622,1526 1622,1434.39 U5.2
$1N4297: R6.2 USB1.10 | length 287.5
  Top Layer w4: v1(1181.98,788) 1190.91,796.92 USB1.10 ; R6.2@1351,809.65 1351,783 v1(1352,782)
  Bottom Layer w4: v1(1181.98,788) 1184,785.98 1184,776 1214,746 1340,746 1352,758 v1(1352,782)
$1N4298: R7.1 USB1.4 | length 282.9
  Top Layer w4: R7.1@892,685.66 891.17,686.49 891.17,713.17 894,716 v1(904,716) ; v1(1072.8,786) USB1.4
  Bottom Layer w4: v1(904,716) 1016,716 1072.8,772.8 v1(1072.8,786)
$1N5455: R3.2 U11.6 | length 211.4
  Top Layer w4: U11.6 1408.28,625.17 1439.17,625.17 1448,634 1448,688 1486,726 1494,726 1499.17,731.17 1499.17,745.17 1504.34,750.34 R3.2
$1N5625: LED1.2 R11.2 | length 117.5
  Top Layer w4: LED1.2@1346,691.5 1346,718 1350.83,722.83 1406,722.83 1408.83,725.66 1408.83,749.52 R11.2@1408,750.35
$1N5640: LED1.1 U11.1 | length 199.7
  Top Layer w4: LED1.1@1346,628.5 1348.5,626 1370,626 1372.83,623.17 1372.83,611.17 1378.83,605.17 1457.17,605.17 1464,612 1464,624 1466.6,626.6 U11.1
$1N8207: FPC3.2 R4.1 | length 375.3
  Top Layer w8: R4.1@821,1274.66 821,1304.6 829,1312.6 FPC3.2
$1N8240: Q1.3 R4.2 | length 57.3
  Top Layer w6: Q1.3@817,1159.68 817,1189 821,1193 R4.2@821,1215.35
$1N8270: Q1.1 R5.1 R9.1 | length 296.1
  Top Layer w6: R9.1@771,1215.34 771,1115 780,1106 ; Q1.1@779.4,1070.31 780,1070.91 780,1106 ; R5.1 879.66,1137.66 858,1116 790,1116 780,1106
+5V: C11.1 R11.1 U11.4 USB1.2 USB1.11 | length 852.5
  Top Layer w10: U11.4 1407.45,702 1438,702 1466,730 1466,772 v1(1458,780) v1(1434.89,780) v1(1412,780) 1408,784 R11.1@1408,809.66
  Top Layer w15: USB1.2 1027.51,794.49 1068,754 v1(1119.9,754) v1(1142.26,754) v1(1163.35,754) 1176.07,754 1216.49,794.42 USB1.11
  Bottom Layer w15: v1(1119.9,754) v1(1142.26,754) v1(1163.35,754) 1178,754 1200,732 1380,732 1394,746 1394,765 1409,780 v1(1434.89,780) v1@1454.07,780
ADC: C4.2 R12.2 R13.2 U2.40 | length 1148.2
  Top Layer w4: R13.2 R12.2 904.54,819.5 C4.2 938.54,902 974,902 1003,873 1085,873 1193.87,981.87 v1(1274,981.87) ; v1(1514,1233.37) 1516.51,1230.86 U2.40
  Bottom Layer w4: v1(1274,981.87) 1282,989.87 1282,1271.31 1291.69,1281 1495,1281 1514,1262 v1(1514,1233.37)
AVDD_28: C8.1 C14.1 U6.4 U12.3 U14.2 | length 1627
  Top Layer w4: v1(931.72,1562.56) 931.72,1556.48 956.87,1531.33 956.87,1517.13 968,1506 1038,1506 1082.99,1461.01 v1(1142,1461.01) ; U6.4@1827.59,1211.9 U6.4
  Top Layer w10: U14.2 830.84,1562.4 831,1562.56 v1(931.72,1562.56) ; U12.3 798.66,1375 v1(810,1386.34) v1(810,1413.52) ; v1(1751.9,1211.9) U6.4@1827.59,1211.9
  Bottom Layer w10: v1@810,1388 v1(810,1413.52) 810,1560 812.56,1562.56 v1(931.72,1562.56) ; v1(1142,1461.01) 1281.01,1322 1722,1322 1751.9,1292.1 v1(1751.9,1211.9)
BAT: pad.1@1030,1556 pad.1@1034,1558 SW3.2 SW3.3 U3.2 U11.3 | length 2115.7
  Top Layer w15: v1(726,689.99) SW3.2 ; v1(751.43,698) 751.52,697.91 v1@776.09,697.91 ; U11.3 1604.6,701.4 1613.4,692.61 U3.2
  Bottom Layer w10: 733.63,697.63 935.22,899.22 935.22,1219.67 974,1258.45 974,1480 v1(1032,1538) v1(1032,1562)
  Bottom Layer w15: v1(726,689.99) 733.63,697.63 ; v1@751.43,697.63 1608.37,697.63 1613.4,692.61 U3.2
  other v1: 778,696 1008,1550 1054,1550
BAT_VIN: C12.1 R13.1 SW3.1 U8.1 U8.3 | length 339.4
  Top Layer w4: U8.3 842.27,786.69 R13.1
  Top Layer w8: SW3.1 686.63,798.09 C12.1 731.84,799.46 U8.1 744.61,814.61 768,838 794,838 819.39,812.61 U8.3
BLK: R5.2 U2.14 | length 478.3
  Top Layer w4: R5.2@911,1078 944,1078 952,1070 952,1002 956,998 v1(1084,998) ; v1(1232,1052) 1237.64,1057.64 U2.14
  Bottom Layer w4: v1(1084,998) 1218,998 1232,1012 v1(1232,1052)
CS: FPC3.8 U2.12 | length 193.3
  Top Layer w4: FPC3.8 1193.47,1194.53 v1(1196,1192) ; v1(1208.1,1104.1) 1223.08,1089.13 U2.12
  Bottom Layer w4: v1(1196,1192) 1196,1116.21 v1(1208.1,1104.1)
D2: U2.17 U6.19 | length 599.5
  Top Layer w4: U2.17 1336,1021.37 1336,1046 1349,1059 1489,1059 v1@1507.62,1077.62 ; v1@1507.62,1079.62 v1(1511.62,1079.62) ; v1(1782,916) 1783.05,917.05 U6.19
  Bottom Layer w4: v1(1511.62,1079.62) 1593.69,1079.62 1757.31,916 v1(1782,916)
D3: U2.18 U6.21 | length 579.3
  Top Layer w4: U2.18 1352.88,1043.96 1359.6,1050.69 1502.9,1050.69 v1(1510.11,1057.9) ; v1(1782,878) 1782.32,877.68 U6.21
  Bottom Layer w4: v1(1510.11,1057.9) 1590.77,1057.9 1770.67,878 v1(1782,878)
D4: U2.27 U6.22 | length 419.7
  Top Layer w4: U2.27 1494.61,988.8 1499.41,984 1648,984 1774.83,857.17 1827.19,857.17 U6.22
D5: U2.28 U6.20 | length 368.5
  Top Layer w4: U2.28 1641.76,1020.24 1764.64,897.36 U6.20
D6: U2.29 U6.18 | length 330.3
  Top Layer w4: U2.29 1630.36,1057.64 1750,938 1826.74,938 U6.18
D7: U2.30 U6.16 | length 320.6
  Top Layer w4: U2.30 1630.61,1073.39 1728,976 1827.91,976 U6.16
D8: U2.31 U6.14 | length 310.8
  Top Layer w4: U2.31 1628.86,1089.14 1702.53,1015.47 U6.14
D9: U2.32 U6.12 | length 301
  Top Layer w4: U2.32 1629.11,1104.89 1679.16,1054.84 U6.12
DC: FPC3.7 U2.11 | length 198.5
  Top Layer w4: FPC3.7 1203.78,1214.22 v1(1210,1208) ; v1(1210,1126) 1231.12,1104.88 U2.11
  Bottom Layer w4: v1(1210,1126) v1(1210,1208)
DVDD_12: C5.1 C13.1 U6.10 U12.2 | length 1309.9
  Top Layer w4: U12.2 882.47,1399.56 C5.1 960.44,1436 C13.1 960.44,1482.44 976,1498 1034.69,1498 1049.34,1483.34 1049.34,1461.7 v1(1059.05,1452)
  Top Layer w10: v1(1724,1094.21) U6.10
  Bottom Layer w10: v1(1059.05,1452) 1219.05,1292 1694,1292 1716,1270 1716,1102.21 v1(1724,1094.21)
GND: C1.2 C2.1 C3.1 C4.1 C5.2 C6.2 C7.2 C8.2 C9.1 C10.2 C11.2 C12.2 C13.2 C14.2 C15.1 C16.2 C17.2 FPC3.1 FPC3.5 FPC3.6 FPC3.12 FPC3.18 FPC3.19 FPC3.20 KEY1.0 KEY1.2 KEY2.0 KEY2.1 pad.1@886,928 pad.1@964,870 pad.2@1390,1082 Q1.2 R3.1 R6.1 R7.2 R9.2 R12.1 SW3.4 SW3.5 U2.19 U2.57 U3.1 U4.3 U5.3 U6.2 U6.8 U6.15 U6.25 U6.26 U8.2 U9.4 U11.2 U12.1 U14.1 USB1.1 USB1.12 USB1.13 USB1.14 X1.2 X1.4 | length 9730.3
  Top Layer w4: SW3.4@617.73,701.53 617.73,614.91 SW3.5@834.27,614.91 ; C17.2@780.54,922 817.46,922 C4.1 ; SW3.5@834.27,701.53 SW3.5@834.27,614.91 ; USB1.13@951.72,634.49 943.58,626.35 892,626.35 880.56,614.91 SW3.5@834.27,614.91 ; C13.2 1015.56,1434.44 v1(1027.96,1422.04) ; USB1.12 1260,833.52 C10.2 ; 1292.28,751.72 1293.66,750.34 R6.1@1351,750.34 ; C2.1 C3.1 1492.04,1706.54 v1(1505.5,1720) ; C7.2 C1.2 1546,1358.54 v1(1546,1340)
  Top Layer w6: 1312.52,965.48 1351.97,965.48 1368.63,982.14 v1(1368.63,983.73) U2.19@1368.63,1016.22
  Top Layer w8: U8.2 v1(782,820) ; C16.2 C15.1 ; FPC3.20 1085.3,1397.28 U9.4
  Top Layer w10: KEY1.2@649.08,1624.63 649.08,1642.92 626,1666 626,1702.82 616.82,1712 776.59,1712 v1(779.22,1709.37) 800.55,1709.37 KEY1.0@806.55,1703.37 ; R9.2@771,1274.65 771,1307 801.6,1337.6 v1(825.7,1337.6) U12.1 1019.58,1337.6 1038.99,1357.01 1063.68,1332.32 FPC3.1 1191.59,1332.32 1201.59,1322.32 1201.59,1263.59 1191.59,1253.59 FPC3.5 1129.59,1253.59 1120.25,1244.25 1130.49,1234 FPC3.6@1158.91,1234 ; v1(828,1076) 852.77,1076 Q1.2 ; C16.2 v1(874,1295.36) ; KEY2.0@953.45,1703.37 959.45,1709.37 v1(976.99,1709.37) 978.36,1708 1130,1708 1130,1664 1110.93,1644.93 KEY2.1@1110.93,1624.63 ; FPC3.19 1080.72,932.72 1094,946 1094,976 1115.68,997.68 FPC3.18 ; v1(1123.74,1115.78) FPC3.12 ; 1247.99,874 1212,874 1202.44,883.56 1202.44,960 1208.44,966 1312,966 1312.52,965.48 1319.76,958.24 X1.2@1319.76,935.37 ; X1.4 1458.97,875.47 1460,874.44 1518,874.44 1518,810.54 R3.1@1515.73,808.27 ; v1(1505.5,1720) v1(1532.36,1720) v1(1557.32,1720) ; U6.26 1707.65,1340 v1(1790,1340) v1(1818.39,1340) ; v1(1734.02,1252) 1827.7,1252 U6.2 ; v1(1788,996.42) 1827.38,996.42 U6.15 ; v1(1788,1132.2) 1789.38,1133.58 U6.8
  Top Layer w15: USB1.1 973.38,821.51 951.72,799.86 951.72,634.49 1292.28,634.49 1292.28,751.72 1292.28,799.86 1270.62,821.51 USB1.12 ; C11.2@1466,807.56 1466.71,808.27 1515.73,808.27 1561.73,808.27 v1(1562.44,807.56) 1576,794 1576,743 1591,728 1616,728 1662.6,681.39 ; U11.2 1550.61,664 1560,654.61 1560,633.39 1584,609.39 1651.39,609.39 1662,620 1662,649.39 U3.1 1662.6,681.39 ; U6.25 1662.6,712.28 1662.6,681.39
  Bottom Layer w4: v1(1788,996.42) v1(1788,1132.2)
  Bottom Layer w6: v1(1355.63,1113) 1355.63,1104.51 1391.54,1068.6 1391.54,1010.78 1368.63,987.87 v1(1368.63,983.73)
  Bottom Layer w10: v1(779.22,1709.37) v1(976.99,1709.37) 1028,1709.37 1042,1695.37 1042,1642 v1(980,1580) 968.81,1568.81 968.81,1556.76 957.09,1545.04 953.29,1545.04 944,1535.75 v1(944,1526) ; v1(825.7,1337.6) 825.7,1306.3 836.64,1295.36 v1(874,1295.36) ; v1(1062.83,906) 1062.83,908 1063.18,908.35 1063.18,1055.22 v1(1123.74,1115.78) 1120,1119.52 v1(1120,1244) ; v1(1064,1368) v1(1064,1422.04) v1(1027.96,1422.04) 1012,1438 1012,1458 1034,1480 1246.45,1480 1324,1402.45 1324,1364 1346,1342 v1(1404.42,1342) 1544,1342 v1(1546,1340) v1(1684,1340) ; v1(1152,1412) 1256,1308 1707.87,1308 1734.02,1281.85 v1(1734.02,1252) ; v1@1506,1720 v1(1532.36,1720) v1(1557.32,1720) 1774,1720 1846,1648 1846,1528 ; U5.3@1709.31,1433.7 1709.31,1525.31 1721.17,1537.17 1759.17,1537.17 1772.3,1550.3 ; U4.3@1772.3,1583.31 1772.3,1550.3 ; v1(1788,1132.2) 1790,1134.2 v1(1790,1340) v1(1818.39,1340) 1842,1340 1846,1344 1846,1528 ; 1772.3,1550.3 1772.3,1549.7 1784,1538 1836,1538 1846,1528
  Bottom Layer w15: USB1.13@951.72,799.86 951.72,881.72 976,906 v1(1012,906) v1(1062.83,906) ; USB1.14@1292.28,799.86 1300.42,808 v1(1497.26,808) 1644,808 1662.6,789.39 U3.1
  other v1: 710,772 1674,776 1730.65,776 964,870 887,916 863,928 909,928 887,940 1752,958 1584,1002 1254,1014 1580,1036 1726,1036 1304,1076 1674,1090 1336,1108 1354,1154 1419.79,1159.26 1354,1206 1694,1208 1662,1256 1288,1416 1530,1452 1070,1498 1108,1562 1507.18,1568.88 876,1606 1328,1606 936,1614
HS(HREF): U2.5 U6.9 | length 641
  Top Layer w4: U2.5 1313.38,1199.38 1346,1232 1470,1232 1484,1218 v1(1484,1186) ; v1(1694,1120) 1700.1,1113.9 U6.9
  Bottom Layer w4: v1(1484,1186) 1504,1186 1514,1176 1638,1176 v1(1694,1120)
KEY: KEY1.1 R8.2 U2.13 | length 994.9
  Top Layer w4: KEY1.1 834.29,1626.63 R8.2 848,1600 860,1588 928,1588 952,1564 952,1550 988,1514 1190,1514 1206,1498 1206,1403.86 1222,1387.86 v1(1222,1240) ; v1(1235.85,1073.36) U2.13
  Bottom Layer w4: v1(1222,1240) 1222.87,1239.13 1222.87,1086.33 v1(1235.85,1073.36)
MCLK: U2.7 U6.13 | length 755
  Top Layer w4: U2.7 1304.13,1167.87 1315.13,1156.87 1315.13,1091.56 1323.69,1083 1473.02,1083.02 1482.02,1092.02 1482.02,1126.02 1500.95,1144.95 v1(1500.95,1166) ; v1(1756,1034) 1826.85,1034 U6.13
  Bottom Layer w4: v1(1500.95,1166) 1624,1166 v1(1756,1034)
MOSI: FPC3.10 U2.9 | length 113.3
  Top Layer w4: FPC3.10 1210.84,1155.16 1230,1136 1267.85,1136 U2.9
PCLK: U2.6 U6.17 | length 779.6
  Top Layer w4: U2.6 1308.38,1183.62 1323.13,1168.87 1323.13,1098.87 1330.98,1091.02 1469.71,1091.02 1474.02,1095.34 1474.02,1140.94 v1(1482.35,1149.26) ; v1(1780,956) 1827.59,956 U6.17
  Bottom Layer w4: v1(1482.35,1149.26) 1602.74,1149.26 1642,1110 1642,1094 v1(1780,956)
QSPI_SCLK: U2.52 U9.6 | length 287.9
  Top Layer w8: v1(1346,1486) 1401.98,1486 U9.6 ; v1(1360,1378) 1368.63,1369.37 U2.52
  Bottom Layer w8: v1(1346,1486) 1326,1486 1318,1478 1318,1462 1360,1420 v1(1360,1378)
QSPI_SD0: U2.53 U9.5 | length 301.1
  Top Layer w8: U2.53 1352.88,1323.06 1267.83,1408.11 1267.83,1425.83 1279,1437 U9.5
QSPI_SD1: U2.55 U9.2 | length 382.7
  Top Layer w8: U9.2 1179,1537 v1(1180,1538) ; v1(1234,1536) 1234,1408 1321.38,1320.62 U2.55
  Bottom Layer w8: v1(1180,1538) 1232,1538 v1(1234,1536)
QSPI_SD2: U2.54 U9.3 | length 363.9
  Top Layer w8: U9.3 1169,1487 v1(1180,1498) ; v1(1250,1498) 1250,1408.97 1337.13,1321.84 U2.54
  Bottom Layer w8: v1(1180,1498) v1(1250,1498)
QSPI_SD3: U2.51 U9.7 | length 340.9
  Top Layer w8: U2.51 1384.38,1388.38 1407.38,1411.38 1446.77,1411.38 1466,1430.61 1466,1496 1450,1512 1414.78,1512 1402.98,1523.8 U9.7
QSPI_SS: R1.1 U2.56 U9.1 | length 656.6
  Top Layer w4: R1.1 902,1614 920,1596 1116.02,1596 U9.1
  Top Layer w8: U9.1 1183,1587 1216,1554 1216,1408 1305.64,1318.36 U2.56
RESET: U6.6 | length 1.5
  Top Layer w4: U6.6@1826.96,1174 U6.6
RP_RST: U2.26
RST: FPC3.11 FPC3.15 | length 178.1
  Top Layer w4: FPC3.15 1117.26,1056.74 1108,1066 1108,1126.61 1116.87,1135.47 FPC3.11
RX0: pad.1@1390,1184 U2.3 | length 138.9
  Top Layer w4: U2.3 1307.14,1230.86 v1(1307.73,1230.27)
  Bottom Layer w4: v1(1307.73,1230.27) 1307.73,1206.27 1334,1180 pad.1@1372,1180
SCL: R10.1 U2.39 U4.1 U5.4 | length 917.8
  Top Layer w4: R10.1 1352.96,1642 v1(1378,1642) ; v1(1514,1212) 1517.11,1215.11 U2.39 ; v1(1595,1239) 1595,1391 1560,1426 1560,1496.39 U4.1 U5.4
  Bottom Layer w4: v1(1378,1642) 1414.39,1642 1457.13,1599.27 1457.13,1549.32 1477.44,1529 1527.39,1529 U4.1 ; v1(1514,1212) 1518,1216 1578,1216 1595,1233 v1(1595,1239)
SCLK: FPC3.9 U2.8 | length 114.6
  Top Layer w4: FPC3.9 1209.16,1174.84 1231.88,1152.12 U2.8
SDA: R2.1 U2.38 U4.4 U5.1 | length 666.6
  Top Layer w4: R2.1 1517.01,1626 U4.4 ; U2.38 1548.4,1200 1582,1200 1584.83,1202.83 1584.83,1230.97 1582.13,1233.67 1582.13,1244.33 1584.83,1247.03 1584.83,1385.17 1552,1418 1552,1454 1524,1482 1524,1547.61 U4.4 ; U5.1 U4.4
SWCLK: pad.2@1540,884 U2.24 | length 224
  Top Layer w4: U2.24 1447.37,988.63 1470,966 1526,966 1560.1,931.9 v1(1560.1,922)
  Bottom Layer w4: pad.2@1540.1,884 1544.1,888 1544.1,906 v1(1560.1,922)
SWD: pad.2@1614,884 U2.25 | length 236.2
  Top Layer w4: U2.25 1463.12,986.99 1476.11,974 1540,974 v1(1594,920)
  Bottom Layer w4: v1(1594,920) 1614,900 pad.2@1614,884
TP_INT: FPC3.16
TP_SCL: FPC3.13 U2.16 U6.5 | length 885.5
  Top Layer w4: FPC3.13 1163.91,1097 1193,1097 1202,1088 1202,1010 1214,998 1284,998 1298.83,983.17 1315.17,983.17 1321.38,989.38 U2.16 1321.38,1049.38 1339,1067 1482.31,1067 1498.02,1082.71 1498.02,1091.96 v1(1508.9,1102.83) ; v1(1610,1120) 1682.64,1192.64 U6.5
  Bottom Layer w4: v1(1508.9,1102.83) 1592.83,1102.83 v1(1610,1120)
TP_SDA: FPC3.14 U2.15 U6.3 | length 902.6
  Top Layer w4: v1(1124,1076.41) FPC3.14 ; v1(1216,1034) 1291.88,1034 U2.15 1305.64,1053.64 1327,1075 1479,1075 1490.02,1086.02 1490.02,1113.57 v1(1500.84,1124.39) ; v1(1590,1128) 1692,1230 1826,1230 U6.3
  Bottom Layer w4: v1(1124,1076.41) 1195.59,1076.41 1214,1058 1214,1036 v1(1216,1034) ; v1(1500.84,1124.39) 1586.39,1124.39 v1(1590,1128)
TX0: pad.2@1390,1234 U2.2 | length 112.8
  Top Layer w4: U2.2 1323.12,1246.61 v1(1323.6,1247.09)
  Bottom Layer w4: v1(1323.6,1247.09) 1343.36,1247.09 1355,1235.45 pad.2@1376,1235.45
USB_D+: U2.47 USB1.6 USB1.8 | length 850.9
  Top Layer w4: USB1.6 1112.16,854.16 1120.1,862.1 v1(1131.9,862.1) 1141.9,862.1 1151.53,852.47 USB1.8 ; v1(1445.87,1257.75) 1447.37,1259.24 U2.47
  Bottom Layer w4: v1(1131.9,862.1) 1426.1,862.1 1445.87,881.87 v1(1445.87,1257.75)
USB_D-: U2.46 USB1.5 USB1.7 | length 922.6
  Top Layer w4: USB1.5 1092.47,789.53 1100,782 v1(1110,782) 1122,782 1132,792 1132,821.35 USB1.7 ; U2.46 1463.12,1262.75 v1(1467.75,1258.13)
  Bottom Layer w4: v1(1110,782) 1122,782 1194,854 1432,854 1453.87,875.87 1453.87,1244.25 v1(1467.75,1258.13)
VSYNC: U2.4 U6.7 | length 623.3
  Top Layer w4: U2.4 1315.11,1215.11 1342,1242 1482,1242 v1(1483.9,1240.1) ; v1@1680,1153.27 v1@1681.27,1153.27 ; v1(1682,1154) v1@1681.27,1153.27 ; U6.7 v1@1681.27,1153.27
  Bottom Layer w4: v1(1483.9,1240.1) 1494,1230 1494,1208 1510,1192 1644,1192 v1(1682,1154)
XTAL_N: C9.2 U2.21 X1.1 | length 159.2
  Top Layer w4: X1.1 X1.1@1398.87,938 ; U2.21 1400.12,939.25 X1.1@1398.87,938 ; C9.2 1456,926 1444,938 X1.1@1398.87,938
XTAL_P: C10.1 U2.20 X1.3 | length 252.9
  Top Layer w4: C10.1 1287.53,908.54 X1.3 1358,912.87 1358,956.69 1367.31,966 1380,966 1384.38,970.38 U2.20
pads on no net: U2.34 U2.35 U2.36 U2.37 U2.41 U6.1 U6.23 U6.24 U8.4 U11.5 USB1.3 USB1.9

## Polygon pours and split planes (outlines as drawn)
GND on Top Layer (solid, remove dead copper, pour order 0): 292,1854 292,370 2062,370 2062,1854
GND on Bottom Layer (solid, remove dead copper, pour order 2): 250,1888 250,250 2148,250 2148,1888

## Keep-outs
Board Outline Layer:
  region: 1814.42,671.7 cw(c1784.89,671.7) 1755.36,671.7 cw(c1784.89,671.7)
  circle w0.1: c1784.89,671.7 r29.53
  region: 1814.42,671.7 1814.05,667.08 1812.97,662.57 1811.2,658.29 1808.78,654.34 1805.77,650.82 1802.25,647.81 1798.3,645.39 1794.01,643.61 1789.51,642.53 1784.89,642.17 1780.27,642.53 1775.77,643.61 1771.48,645.39 1767.53,647.81 1764.01,650.82 1761,654.34 1758.58,658.29 1756.81,662.57 1755.73,667.08 1755.36,671.7 1755.73,676.32 1756.81,680.82 1758.58,685.1 1761,689.05 1764.01,692.58 1767.53,695.58 1771.48,698.01 1775.77,699.78 1780.27,700.86 1784.89,701.22 1789.51,700.86 1794.01,699.78 1798.3,698.01 1802.25,695.58 1805.77,692.58 1808.78,689.05 1811.2,685.1 1812.97,680.82 1814.05,676.32
  region: 554.58,671.7 cw(c525.05,671.7) 495.52,671.7 cw(c525.05,671.7)
  circle w0.1: c525.05,671.7 r29.53
  region: 554.58,671.7 554.21,667.08 553.13,662.57 551.36,658.29 548.94,654.34 545.93,650.82 542.41,647.81 538.46,645.39 534.17,643.61 529.67,642.53 525.05,642.17 520.43,642.53 515.93,643.61 511.64,645.39 507.69,647.81 504.17,650.82 501.16,654.34 498.74,658.29 496.97,662.57 495.89,667.08 495.52,671.7 495.89,676.32 496.97,680.82 498.74,685.1 501.16,689.05 504.17,692.58 507.69,695.58 511.64,698.01 515.93,699.78 520.43,700.86 525.05,701.22 529.67,700.86 534.17,699.78 538.46,698.01 542.41,695.58 545.93,692.58 548.94,689.05 551.36,685.1 553.13,680.82 554.21,676.32
  region: 554.58,1655.7 cw(c525.05,1655.7) 495.52,1655.7 cw(c525.05,1655.7)
  circle w0.1: c525.05,1655.7 r29.53
  region: 554.58,1655.7 554.21,1651.08 553.13,1646.57 551.36,1642.29 548.94,1638.34 545.93,1634.82 542.41,1631.81 538.46,1629.39 534.17,1627.61 529.67,1626.53 525.05,1626.17 520.43,1626.53 515.93,1627.61 511.64,1629.39 507.69,1631.81 504.17,1634.82 501.16,1638.34 498.74,1642.29 496.97,1646.57 495.89,1651.08 495.52,1655.7 495.89,1660.32 496.97,1664.82 498.74,1669.1 501.16,1673.05 504.17,1676.58 507.69,1679.58 511.64,1682.01 515.93,1683.78 520.43,1684.86 525.05,1685.22 529.67,1684.86 534.17,1683.78 538.46,1682.01 542.41,1679.58 545.93,1676.58 548.94,1673.05 551.36,1669.1 553.13,1664.82 554.21,1660.32
  lines w10: 511.09,593 1454.39,592.98 1784.89,593 ; 525.05,592.95 cw(c525.05,671.69) 446.31,671.69 446.31,730.74 643.16,730.74 643.16,845.16 712,914 712,936 742,966 ; 643.2,1594.89 643.2,1425.7 742.89,1425.7 ; 643.2,1596.9 446.31,1596.9 446.31,1655.94 cw(c525.05,1655.94) 525.05,1734.68 1372.39,1734.69 1784.9,1734.69 cw(c1784.89,1655.94) 1863.63,1655.94 ; 742.89,966.7 742.89,1424 ; 1784.08,592.95 ccw(c1784.89,671.69) 1863.63,672.56 ; 1863.59,671.7 1863.6,730.19 ; 1863.6,730.92 1863.6,1606.7 1863.59,1655.9

## Silkscreen, mask and mechanical layers (free items; w line width, h text height)
Top Silkscreen Layer:
  circle w39.37: c1784.89,671.7 r35
  circle w39.37: c525.05,671.7 r35
  circle w39.37: c525.05,1655.95 r35
  circle w10: c1784.89,671.7 r78.74
  circle w10: c525.05,671.7 r78.74
  circle w10: c525.05,1655.95 r78.74
  text "0.1" at 1490,1682 h30
  text "10u" at 1488,1660 h30
  text "30k" at 822,1654 h30
  text "1k" at 888,1654 h30
  text "10uh" at 1260,1640 h35 r90
  text "BAT" at 1008,1582 h30
  text "1k" at 1420,1560 h30 r90
  text "5" at 1462,1520 h35
  text "10u" at 812,1512 h30
  text "0.1" at 876,1512 h30
  text "1k" at 1420,1508 h30 r90
  text "2.8LDO" at 752,1468 h35 r90
  text "0.1" at 1004,1450 h30 r90
  text "10u" at 902,1356 h30
  text "0.1" at 1564,1348 h30 r90
  text "1u" at 1448,1338 h30 r90
  text "1.2LDO" at 854,1320 h35 r90
  text "30k" at 744,1228 h30
  text "6.2" at 799,1228 h30
  text "10u" at 850,1226 h30
  text "0.1" at 906,1226 h30
  text "3400" at 774,1098 h35
  text "6.2" at 892,1092 h30
  text "JLCJLCJLCJLC" at 1090,1000 h50 r90
  text "GND" at 860.6,967 h30
  text "12P" at 1246,910 h30 r90
  text "." at 806,894 h20 r90
  text "GND" at 988,854 h30
  text "0.1" at 904,848 h30 r90
  text "1u" at 1484,838 h30
  text "12P" at 1434,834 h30
  text "68k" at 898,792 h30 r90
  text "5.1k" at 1326,764 h30
  text "1k" at 1390,764 h30
  text "1u" at 1450,764 h30
  text "2k" at 1508,764 h30
  text "30k" at 900,740 h30 r90
  text "5.1k" at 862,640 h30
  text "4057" at 1478,618 h35 r90
  text "." at 1548,596 h20 r90
Bottom Silkscreen Layer:
  drawing of 19 lines, arcs and shapes, not listed
  text "BOOTSET" at 1130,1616 h40
  text "BAT" at 1138,1536 h40
  text "双光融合热成像" at 1224,1438 h60
  text "TX0" at 1488.36,1212 h40
  text "RX0" at 1488.36,1161.79 h40
  text "3V3" at 1488.36,1110 h40
  text "GND" at 1488.36,1055 h40
  text "GND" at 1062,850 h40
  text "SWCLK" at 1566.49,813 h40
  text "SWD" at 1664.36,813 h40
Mechanical Layer:
  circle w0.1: c1784.89,671.7 r29.53
  circle w0.1: c525.05,671.7 r29.53
  circle w0.1: c525.05,1655.7 r29.53